# Altium PCB MONO65_PLATE_A1.PcbDoc
Units mm, origin at the board's own origin, x right, y up, seen from the top; angles counter-clockwise.
Board outline 321.35 x 111.8 mm, 2 copper layers (Component Side, Solder Side), stack 1.586 mm thick; 1 components, 0 nets, 0 pads, 0 vias.
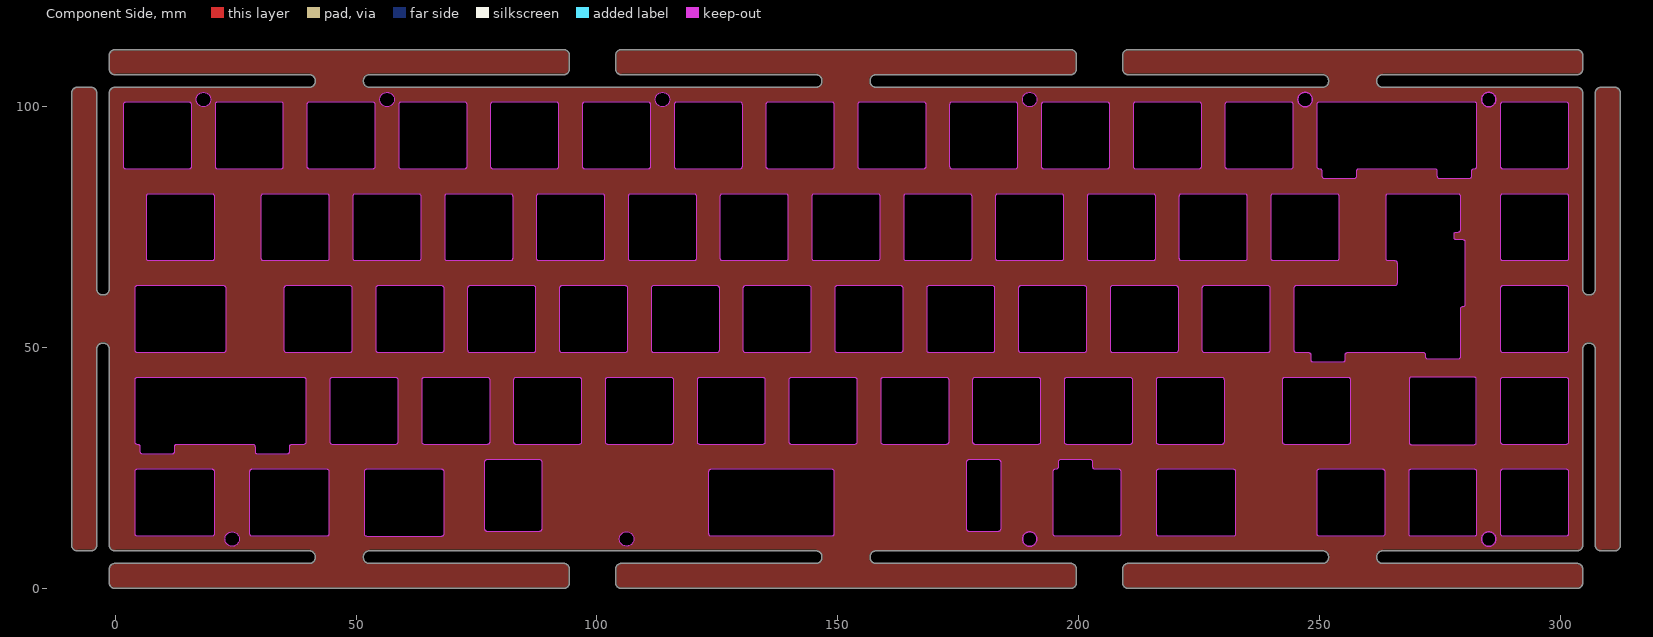
[diagram p0: Component Side view]
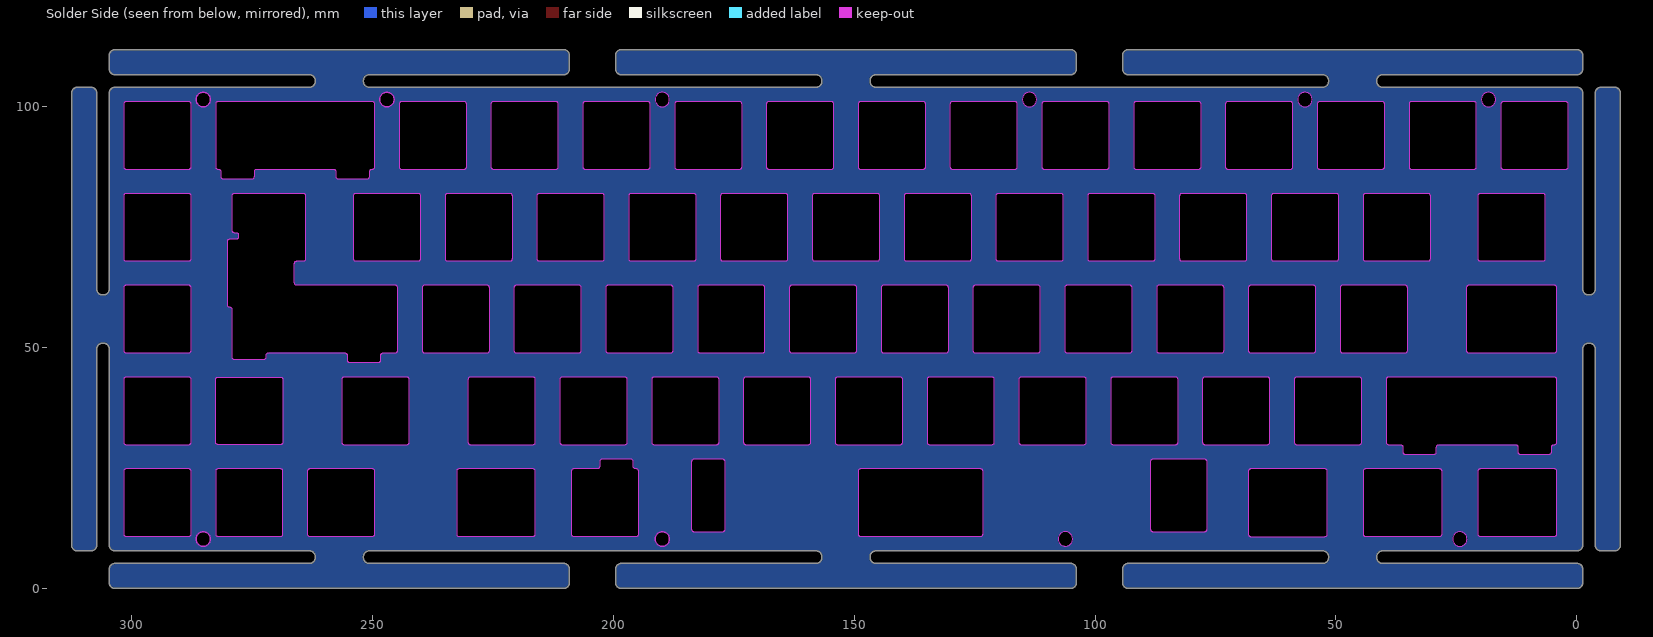
[diagram p1: Solder Side view, seen from below]

## Layer stack, top to bottom
Top Solder: solder mask 0.0102, Solder Resist, Dk 3.5
Component Side: signal copper 0.018
Dielectric 3: core 1.55, Core-009, Dk 4.5
Solder Side: signal copper 0.018
Bottom Solder: solder mask 0.0102, Solder Resist, Dk 3.5

## Board outline
303 vertices, not listed, extent -9,0 312.35,111.8
cut-out: 285.05,102.955 cw(c285.05,101.455) 286.55,101.455 cw(c285.05,101.455) 285.05,99.955 cw(c285.05,101.455) 283.55,101.455 cw(c285.05,101.455)
cut-out: 246.95,102.955 cw(c246.95,101.455) 248.45,101.455 cw(c246.95,101.455) 246.95,99.955 cw(c246.95,101.455) 245.45,101.455 cw(c246.95,101.455)
cut-out: 189.8,102.955 cw(c189.8,101.455) 191.3,101.455 cw(c189.8,101.455) 189.8,99.955 cw(c189.8,101.455) 188.3,101.455 cw(c189.8,101.455)
cut-out: 113.6,102.955 cw(c113.6,101.455) 115.1,101.455 cw(c113.6,101.455) 113.6,99.955 cw(c113.6,101.455) 112.1,101.455 cw(c113.6,101.455)
cut-out: 56.45,102.955 cw(c56.45,101.455) 57.95,101.455 cw(c56.45,101.455) 56.45,99.955 cw(c56.45,101.455) 54.95,101.455 cw(c56.45,101.455)
cut-out: 18.35,102.955 cw(c18.35,101.455) 19.85,101.455 cw(c18.35,101.455) 18.35,99.955 cw(c18.35,101.455) 16.85,101.455 cw(c18.35,101.455)
cut-out: 285.05,8.755 cw(c285.05,10.255) 283.55,10.255 cw(c285.05,10.255) 285.05,11.755 cw(c285.05,10.255) 286.55,10.255 cw(c285.05,10.255)
cut-out: 189.8,8.756 cw(c189.8,10.256) 188.3,10.256 cw(c189.8,10.256) 189.8,11.756 cw(c189.8,10.256) 191.3,10.256 cw(c189.8,10.256)
cut-out: 24.303,8.755 cw(c24.303,10.255) 22.803,10.255 cw(c24.303,10.255) 24.303,11.755 cw(c24.303,10.255) 25.803,10.255 cw(c24.303,10.255)
cut-out: 188.3,10.255 ccw(c189.8,10.255) 189.8,8.755 ccw(c189.8,10.255) 191.3,10.255 ccw(c189.8,10.255) 189.8,11.755 ccw(c189.8,10.255)
cut-out: 283.55,101.455 ccw(c285.05,101.455) 285.05,99.955 ccw(c285.05,101.455) 286.55,101.455 ccw(c285.05,101.455) 285.05,102.955 ccw(c285.05,101.455)
cut-out: 245.45,101.455 ccw(c246.95,101.455) 246.95,99.955 ccw(c246.95,101.455) 248.45,101.455 ccw(c246.95,101.455) 246.95,102.955 ccw(c246.95,101.455)
cut-out: 192.447,87.146 cw(c192.8,87.5) 192.3,87.5 192.3,100.5 cw(c192.798,100.5) 192.446,100.853 cw(c192.8,100.5) 192.8,101 205.8,101 cw(c205.8,100.502) 206.153,100.854 cw(c205.8,100.5) 206.3,100.5 206.3,87.5 cw(c205.802,87.5) 206.154,87.147 cw(c205.8,87.5) 205.8,87 192.8,87 cw(c192.8,87.498)
cut-out: 189.8,99.955 cw(c189.8,101.455) 188.3,101.455 cw(c189.8,101.455) 189.8,102.955 cw(c189.8,101.455) 191.3,101.455 cw(c189.8,101.455)
cut-out: 173.25,87.5 173.25,100.5 cw(c173.748,100.5) 173.396,100.853 cw(c173.75,100.5) 173.75,101 186.75,101 cw(c186.75,100.502) 187.103,100.854 cw(c186.75,100.5) 187.25,100.5 187.25,87.5 cw(c186.752,87.5) 187.104,87.147 cw(c186.75,87.5) 186.75,87 173.75,87 cw(c173.75,87.498) 173.397,87.146 cw(c173.75,87.5)
cut-out: 154.2,87.5 154.2,100.5 cw(c154.698,100.5) 154.346,100.853 cw(c154.7,100.5) 154.7,101 167.7,101 cw(c167.7,100.502) 168.053,100.854 cw(c167.7,100.5) 168.2,100.5 168.2,87.5 cw(c167.702,87.5) 168.054,87.147 cw(c167.7,87.5) 167.7,87 154.7,87 cw(c154.7,87.498) 154.347,87.146 cw(c154.7,87.5)
cut-out: 135.297,87.146 cw(c135.65,87.5) 135.15,87.5 135.15,100.5 cw(c135.648,100.5) 135.296,100.853 cw(c135.65,100.5) 135.65,101 148.65,101 cw(c148.65,100.502) 149.003,100.854 cw(c148.65,100.5) 149.15,100.5 149.15,87.5 cw(c148.652,87.5) 149.004,87.147 cw(c148.65,87.5) 148.65,87 135.65,87 cw(c135.65,87.498)
cut-out: 116.1,87.5 116.1,100.5 cw(c116.598,100.5) 116.246,100.853 cw(c116.6,100.5) 116.6,101 129.6,101 cw(c129.6,100.502) 129.953,100.854 cw(c129.6,100.5) 130.1,100.5 130.1,87.5 cw(c129.602,87.5) 129.954,87.147 cw(c129.6,87.5) 129.6,87 116.6,87 cw(c116.6,87.498) 116.247,87.146 cw(c116.6,87.5)
cut-out: 113.6,99.955 cw(c113.6,101.455) 112.1,101.455 cw(c113.6,101.455) 113.6,102.955 cw(c113.6,101.455) 115.1,101.455 cw(c113.6,101.455)
cut-out: 97.05,87.5 97.05,100.5 cw(c97.548,100.5) 97.196,100.853 cw(c97.55,100.5) 97.55,101 110.55,101 cw(c110.55,100.502) 110.903,100.854 cw(c110.55,100.5) 111.05,100.5 111.05,87.5 cw(c110.552,87.5) 110.904,87.147 cw(c110.55,87.5) 110.55,87 97.55,87 cw(c97.55,87.498) 97.197,87.146 cw(c97.55,87.5)
cut-out: 78.147,87.146 cw(c78.5,87.5) 78,87.5 78,100.5 cw(c78.498,100.5) 78.146,100.853 cw(c78.5,100.5) 78.5,101 91.5,101 cw(c91.5,100.502) 91.853,100.854 cw(c91.5,100.5) 92,100.5 92,87.5 cw(c91.502,87.5) 91.854,87.147 cw(c91.5,87.5) 91.5,87 78.5,87 cw(c78.5,87.498)
cut-out: 56.45,99.955 cw(c56.45,101.455) 54.95,101.455 cw(c56.45,101.455) 56.45,102.955 cw(c56.45,101.455) 57.95,101.455 cw(c56.45,101.455)
cut-out: 58.95,87.5 58.95,100.5 cw(c59.448,100.5) 59.096,100.853 cw(c59.45,100.5) 59.45,101 72.45,101 cw(c72.45,100.502) 72.803,100.854 cw(c72.45,100.5) 72.95,100.5 72.95,87.5 cw(c72.452,87.5) 72.804,87.147 cw(c72.45,87.5) 72.45,87 59.45,87 cw(c59.45,87.498) 59.097,87.146 cw(c59.45,87.5)
cut-out: 39.9,87.5 39.9,100.5 cw(c40.398,100.5) 40.046,100.853 cw(c40.4,100.5) 40.4,101 53.4,101 cw(c53.4,100.502) 53.753,100.854 cw(c53.4,100.5) 53.9,100.5 53.9,87.5 cw(c53.402,87.5) 53.754,87.147 cw(c53.4,87.5) 53.4,87 40.4,87 cw(c40.4,87.498) 40.047,87.146 cw(c40.4,87.5)
cut-out: 20.85,87.5 20.85,100.5 cw(c21.348,100.5) 20.996,100.853 cw(c21.35,100.5) 21.35,101 34.35,101 cw(c34.35,100.502) 34.703,100.854 cw(c34.35,100.5) 34.85,100.5 34.85,87.5 cw(c34.352,87.5) 34.704,87.147 cw(c34.35,87.5) 34.35,87 21.35,87 cw(c21.35,87.498) 20.997,87.146 cw(c21.35,87.5)
cut-out: 18.35,99.955 cw(c18.35,101.455) 16.85,101.455 cw(c18.35,101.455) 18.35,102.955 cw(c18.35,101.455) 19.85,101.455 cw(c18.35,101.455)
cut-out: 1.8,87.5 1.8,100.46 cw(c2.319,100.48) 1.938,100.833 cw(c2.32,100.48) 2.3,101 15.304,101 cw(c15.288,100.481) 15.668,100.835 cw(c15.287,100.479) 15.808,100.46 15.807,87.5 cw(c15.306,87.5) 15.659,87.145 cw(c15.305,87.5) 15.303,86.999 2.3,87 cw(c2.3,87.499) 1.947,87.146 cw(c2.301,87.5)
cut-out: 6.563,68.45 6.563,81.45 6.562,81.45 cw(c7.061,81.45) 6.709,81.803 cw(c7.063,81.45) 7.063,81.95 20.062,81.95 20.063,81.95 cw(c20.063,81.452) 20.416,81.804 cw(c20.062,81.45) 20.563,81.45 20.563,68.45 cw(c20.064,68.45) 20.416,68.097 cw(c20.062,68.45) 20.063,67.95 7.063,67.95 cw(c7.062,68.448) 6.709,68.096 cw(c7.063,68.45)
cut-out: 30.522,68.096 cw(c30.875,68.45) 30.375,68.45 30.375,81.45 cw(c30.873,81.45) 30.521,81.803 cw(c30.875,81.45) 30.875,81.95 43.875,81.95 cw(c43.875,81.452) 44.228,81.804 cw(c43.875,81.45) 44.375,81.45 44.375,68.45 cw(c43.877,68.45) 44.229,68.097 cw(c43.875,68.45) 43.875,67.95 30.875,67.95 cw(c30.875,68.448)
cut-out: 49.572,68.096 cw(c49.925,68.45) 49.425,68.45 49.425,81.45 cw(c49.923,81.45) 49.571,81.803 cw(c49.925,81.45) 49.925,81.95 62.925,81.95 cw(c62.925,81.452) 63.278,81.804 cw(c62.925,81.45) 63.425,81.45 63.425,68.45 cw(c62.927,68.45) 63.279,68.097 cw(c62.925,68.45) 62.925,67.95 49.925,67.95 cw(c49.925,68.448)
cut-out: 68.475,68.45 68.475,81.45 cw(c68.973,81.45) 68.621,81.803 cw(c68.975,81.45) 68.975,81.95 81.975,81.95 cw(c81.975,81.452) 82.328,81.804 cw(c81.975,81.45) 82.475,81.45 82.475,68.45 cw(c81.977,68.45) 82.329,68.097 cw(c81.975,68.45) 81.975,67.95 68.975,67.95 cw(c68.975,68.448) 68.622,68.096 cw(c68.975,68.45)
cut-out: 87.672,68.096 cw(c88.025,68.45) 87.525,68.45 87.525,81.45 cw(c88.023,81.45) 87.671,81.803 cw(c88.025,81.45) 88.025,81.95 101.025,81.95 cw(c101.025,81.452) 101.378,81.804 cw(c101.025,81.45) 101.525,81.45 101.525,68.45 cw(c101.027,68.45) 101.379,68.097 cw(c101.025,68.45) 101.025,67.95 88.025,67.95 cw(c88.025,68.448)
cut-out: 106.575,68.45 106.575,81.45 cw(c107.073,81.45) 106.721,81.803 cw(c107.075,81.45) 107.075,81.95 120.075,81.95 cw(c120.075,81.452) 120.428,81.804 cw(c120.075,81.45) 120.575,81.45 120.575,68.45 cw(c120.077,68.45) 120.429,68.097 cw(c120.075,68.45) 120.075,67.95 107.075,67.95 cw(c107.075,68.448) 106.722,68.096 cw(c107.075,68.45)
cut-out: 125.772,68.096 cw(c126.125,68.45) 125.625,68.45 125.625,81.45 cw(c126.123,81.45) 125.771,81.803 cw(c126.125,81.45) 126.125,81.95 139.125,81.95 cw(c139.125,81.452) 139.478,81.804 cw(c139.125,81.45) 139.625,81.45 139.625,68.45 cw(c139.127,68.45) 139.479,68.097 cw(c139.125,68.45) 139.125,67.95 126.125,67.95 cw(c126.125,68.448)
cut-out: 144.675,68.45 144.675,81.45 cw(c145.173,81.45) 144.821,81.803 cw(c145.175,81.45) 145.175,81.95 158.175,81.95 cw(c158.175,81.452) 158.528,81.804 cw(c158.175,81.45) 158.675,81.45 158.675,68.45 cw(c158.177,68.45) 158.529,68.097 cw(c158.175,68.45) 158.175,67.95 145.175,67.95 cw(c145.175,68.448) 144.822,68.096 cw(c145.175,68.45)
cut-out: 163.725,68.45 163.725,81.45 cw(c164.223,81.45) 163.871,81.803 cw(c164.225,81.45) 164.225,81.95 177.225,81.95 cw(c177.225,81.452) 177.578,81.804 cw(c177.225,81.45) 177.725,81.45 177.725,68.45 cw(c177.227,68.45) 177.579,68.097 cw(c177.225,68.45) 177.225,67.95 164.225,67.95 cw(c164.225,68.448) 163.872,68.096 cw(c164.225,68.45)
cut-out: 182.922,68.096 cw(c183.275,68.45) 182.775,68.45 182.775,81.45 cw(c183.273,81.45) 182.921,81.803 cw(c183.275,81.45) 183.275,81.95 196.275,81.95 cw(c196.275,81.452) 196.628,81.804 cw(c196.275,81.45) 196.775,81.45 196.775,68.45 cw(c196.277,68.45) 196.629,68.097 cw(c196.275,68.45) 196.275,67.95 183.275,67.95 cw(c183.275,68.448)
cut-out: 201.972,68.096 cw(c202.326,68.45) 201.825,68.45 201.825,81.45 cw(c202.325,81.45) 201.971,81.803 cw(c202.325,81.449) 202.325,81.95 215.325,81.95 cw(c215.325,81.45) 215.678,81.804 cw(c215.324,81.45) 215.825,81.45 215.825,68.45 cw(c215.325,68.45) 215.679,68.097 cw(c215.325,68.451) 215.325,67.95 202.325,67.95 cw(c202.325,68.45)
cut-out: 221.022,68.096 cw(c221.376,68.45) 220.875,68.45 220.875,81.45 cw(c221.375,81.45) 221.021,81.803 cw(c221.375,81.449) 221.375,81.95 234.375,81.95 cw(c234.375,81.45) 234.728,81.804 cw(c234.374,81.45) 234.875,81.45 234.875,68.45 cw(c234.375,68.45) 234.729,68.097 cw(c234.375,68.451) 234.375,67.95 221.375,67.95 cw(c221.375,68.45)
cut-out: 240.072,68.096 cw(c240.425,68.45) 239.925,68.45 239.925,81.45 cw(c240.423,81.45) 240.071,81.803 cw(c240.425,81.45) 240.425,81.95 253.425,81.95 cw(c253.425,81.452) 253.778,81.804 cw(c253.425,81.45) 253.925,81.45 253.925,68.45 cw(c253.427,68.45) 253.779,68.097 cw(c253.425,68.45) 253.425,67.95 240.425,67.95 cw(c240.425,68.448)
cut-out: 250.684,85.146 cw(c251.037,85.5) 250.537,85.5 250.537,86.5 ccw(c250.036,86.5) 250.39,86.854 ccw(c250.037,86.5) 250.037,87 249.95,87 cw(c249.95,87.498) 249.597,87.146 cw(c249.95,87.5) 249.45,87.5 249.45,100.5 cw(c249.948,100.5) 249.596,100.853 cw(c249.95,100.5) 249.95,101 282,101 cw(c282,100.502) 282.353,100.854 cw(c282,100.5) 282.5,100.5 282.5,87.5 cw(c282.002,87.5) 282.354,87.147 cw(c282,87.5) 282,87 281.913,87 ccw(c281.913,86.499) 281.559,86.853 ccw(c281.913,86.5) 281.413,86.5 281.413,85.5 cw(c280.915,85.5) 281.267,85.147 cw(c280.913,85.5) 280.913,85 274.913,85 cw(c274.913,85.498) 274.56,85.146 cw(c274.913,85.5) 274.413,85.5 274.413,86.5 ccw(c273.912,86.5) 274.266,86.854 ccw(c273.913,86.5) 273.913,87 258.037,87 ccw(c258.037,86.499) 257.683,86.853 ccw(c258.037,86.5) 257.537,86.5 257.537,85.5 cw(c257.039,85.5) 257.391,85.147 cw(c257.037,85.5) 257.037,85 251.037,85 cw(c251.037,85.498)
cut-out: 287.55,87.5 287.55,100.5 cw(c288.05,100.5) 287.696,100.853 cw(c288.05,100.499) 288.05,101 301.05,101 cw(c301.05,100.5) 301.403,100.854 cw(c301.049,100.5) 301.55,100.5 301.55,87.5 cw(c301.05,87.5) 301.404,87.147 cw(c301.05,87.501) 301.05,87 288.05,87 cw(c288.05,87.5) 287.697,87.146 cw(c288.051,87.5)
cut-out: 287.697,68.096 cw(c288.051,68.45) 287.55,68.45 287.55,81.45 cw(c288.05,81.45) 287.696,81.803 cw(c288.05,81.449) 288.05,81.95 301.05,81.95 cw(c301.05,81.45) 301.403,81.804 cw(c301.049,81.45) 301.55,81.45 301.55,68.45 cw(c301.05,68.45) 301.404,68.097 cw(c301.05,68.451) 301.05,67.95 288.05,67.95 cw(c288.05,68.45)
cut-out: 287.55,49.4 287.55,62.4 cw(c288.048,62.4) 287.696,62.753 cw(c288.05,62.4) 288.05,62.9 301.05,62.9 cw(c301.05,62.402) 301.403,62.754 cw(c301.05,62.4) 301.55,62.4 301.55,49.4 cw(c301.052,49.4) 301.404,49.047 cw(c301.05,49.4) 301.05,48.9 288.05,48.9 cw(c288.05,49.398) 287.697,49.046 cw(c288.05,49.4)
cut-out: 248.194,47.4 248.194,48.4 ccw(c247.693,48.4) 248.047,48.754 ccw(c247.694,48.401) 247.694,48.9 245.188,48.9 cw(c245.187,49.4) 244.834,49.046 cw(c245.189,49.4) 244.688,49.4 244.688,62.4 cw(c245.187,62.4) 244.834,62.753 cw(c245.188,62.399) 245.188,62.9 265.619,62.9 ccw(c265.618,63.4) 265.972,63.047 ccw(c265.62,63.4) 266.119,63.4 266.119,67.45 ccw(c265.618,67.45) 265.972,67.804 ccw(c265.619,67.451) 265.619,67.95 264.238,67.95 cw(c264.238,68.45) 263.885,68.096 cw(c264.239,68.45) 263.738,68.45 263.738,81.45 cw(c264.238,81.45) 263.884,81.803 cw(c264.238,81.449) 264.238,81.95 278.619,81.95 cw(c278.619,81.45) 278.972,81.804 cw(c278.617,81.449) 279.119,81.45 279.119,74.363 cw(c278.619,74.363) 278.973,74.01 cw(c278.619,74.364) 278.619,73.863 278.238,73.863 ccw(c278.238,73.363) 277.884,73.716 ccw(c278.236,73.363) 277.738,73.363 277.738,72.925 ccw(c278.238,72.925) 277.885,72.571 ccw(c278.238,72.923) 278.238,72.425 279.619,72.425 cw(c279.619,71.925) 279.972,72.279 cw(c279.617,71.924) 280.119,71.925 280.119,58.925 cw(c279.619,58.925) 279.973,58.572 cw(c279.619,58.926) 279.619,58.425 ccw(c279.619,57.925) 279.265,58.278 ccw(c279.617,57.925) 279.119,57.925 279.119,48.045 cw(c278.619,48.045) 278.973,47.692 cw(c278.619,48.046) 278.619,47.545 272.494,47.545 cw(c272.493,48.045) 272.14,47.691 cw(c272.495,48.045) 271.994,48.045 271.994,48.4 ccw(c271.493,48.4) 271.847,48.754 ccw(c271.494,48.401) 271.494,48.9 255.694,48.9 ccw(c255.694,48.4) 255.34,48.753 ccw(c255.692,48.4) 255.194,48.4 255.194,47.4 cw(c254.694,47.4) 255.048,47.047 cw(c254.694,47.401) 254.694,46.9 248.694,46.9 cw(c248.693,47.4) 248.34,47.046 cw(c248.695,47.4)
cut-out: 225.784,49.046 cw(c226.138,49.4) 225.637,49.4 225.638,49.4 225.638,62.4 225.637,62.4 cw(c226.136,62.4) 225.784,62.753 cw(c226.138,62.4) 226.138,62.9 239.137,62.9 239.138,62.9 cw(c239.138,62.402) 239.491,62.754 cw(c239.137,62.4) 239.638,62.4 239.638,49.4 cw(c239.139,49.4) 239.491,49.047 cw(c239.137,49.4) 239.138,48.9 226.138,48.9 cw(c226.137,49.398)
cut-out: 206.734,49.046 cw(c207.088,49.4) 206.587,49.4 206.588,49.4 206.588,62.4 206.587,62.4 cw(c207.086,62.4) 206.734,62.753 cw(c207.088,62.4) 207.088,62.9 220.087,62.9 220.088,62.9 cw(c220.088,62.402) 220.441,62.754 cw(c220.087,62.4) 220.588,62.4 220.588,49.4 cw(c220.089,49.4) 220.441,49.047 cw(c220.087,49.4) 220.088,48.9 207.088,48.9 cw(c207.087,49.398)
cut-out: 187.684,49.046 cw(c188.038,49.4) 187.537,49.4 187.538,49.4 187.538,62.4 187.537,62.4 cw(c188.036,62.4) 187.684,62.753 cw(c188.038,62.4) 188.038,62.9 201.037,62.9 201.038,62.9 cw(c201.038,62.402) 201.391,62.754 cw(c201.037,62.4) 201.538,62.4 201.538,49.4 cw(c201.039,49.4) 201.391,49.047 cw(c201.037,49.4) 201.038,48.9 188.038,48.9 cw(c188.037,49.398)
cut-out: 168.488,49.4 168.488,62.4 168.487,62.4 cw(c168.986,62.4) 168.634,62.753 cw(c168.988,62.4) 168.988,62.9 181.987,62.9 181.988,62.9 cw(c181.988,62.402) 182.341,62.754 cw(c181.987,62.4) 182.488,62.4 182.488,49.4 cw(c181.989,49.4) 182.341,49.047 cw(c181.987,49.4) 181.988,48.9 168.988,48.9 cw(c168.987,49.398) 168.634,49.046 cw(c168.988,49.4)
cut-out: 149.438,49.4 149.438,62.4 cw(c149.937,62.4) 149.584,62.753 cw(c149.938,62.399) 149.938,62.9 162.938,62.9 cw(c162.938,62.4) 163.291,62.754 cw(c162.936,62.4) 163.438,62.4 163.438,49.4 cw(c162.938,49.4) 163.291,49.047 cw(c162.937,49.401) 162.938,48.9 149.938,48.9 cw(c149.937,49.4) 149.584,49.046 cw(c149.939,49.4)
cut-out: 130.388,49.4 130.388,62.4 cw(c130.887,62.4) 130.534,62.753 cw(c130.888,62.399) 130.888,62.9 143.888,62.9 cw(c143.888,62.4) 144.241,62.754 cw(c143.886,62.4) 144.388,62.4 144.388,49.4 cw(c143.888,49.4) 144.241,49.047 cw(c143.887,49.401) 143.888,48.9 130.888,48.9 cw(c130.887,49.4) 130.534,49.046 cw(c130.889,49.4)
cut-out: 111.484,49.046 cw(c111.838,49.4) 111.337,49.4 111.338,49.4 111.338,62.4 111.337,62.4 cw(c111.836,62.4) 111.484,62.753 cw(c111.838,62.4) 111.838,62.9 124.837,62.9 124.838,62.9 cw(c124.838,62.402) 125.191,62.754 cw(c124.837,62.4) 125.338,62.4 125.338,49.4 cw(c124.839,49.4) 125.191,49.047 cw(c124.837,49.4) 124.838,48.9 111.838,48.9 cw(c111.837,49.398)
cut-out: 92.434,49.046 cw(c92.788,49.4) 92.287,49.4 92.288,49.4 92.288,62.4 92.287,62.4 cw(c92.786,62.4) 92.434,62.753 cw(c92.788,62.4) 92.788,62.9 105.787,62.9 105.788,62.9 cw(c105.788,62.402) 106.141,62.754 cw(c105.787,62.4) 106.288,62.4 106.288,49.4 cw(c105.789,49.4) 106.141,49.047 cw(c105.787,49.4) 105.788,48.9 92.788,48.9 cw(c92.787,49.398)
cut-out: 73.384,49.046 cw(c73.738,49.4) 73.237,49.4 73.238,49.4 73.238,62.4 73.237,62.4 cw(c73.736,62.4) 73.384,62.753 cw(c73.738,62.4) 73.738,62.9 86.737,62.9 86.738,62.9 cw(c86.738,62.402) 87.091,62.754 cw(c86.737,62.4) 87.238,62.4 87.238,49.4 cw(c86.739,49.4) 87.091,49.047 cw(c86.737,49.4) 86.738,48.9 73.738,48.9 cw(c73.737,49.398)
cut-out: 54.334,49.046 cw(c54.688,49.4) 54.187,49.4 54.188,49.4 54.188,62.4 54.187,62.4 cw(c54.686,62.4) 54.334,62.753 cw(c54.688,62.4) 54.688,62.9 67.687,62.9 67.688,62.9 cw(c67.688,62.402) 68.041,62.754 cw(c67.687,62.4) 68.188,62.4 68.188,49.4 cw(c67.689,49.4) 68.041,49.047 cw(c67.687,49.4) 67.688,48.9 54.688,48.9 cw(c54.687,49.398)
cut-out: 35.138,49.4 35.138,62.4 35.137,62.4 cw(c35.636,62.4) 35.284,62.753 cw(c35.638,62.4) 35.638,62.9 48.637,62.9 48.638,62.9 cw(c48.638,62.402) 48.991,62.754 cw(c48.637,62.4) 49.138,62.4 49.138,49.4 cw(c48.639,49.4) 48.991,49.047 cw(c48.637,49.4) 48.638,48.9 35.638,48.9 cw(c35.637,49.398) 35.284,49.046 cw(c35.638,49.4)
cut-out: 4.328,49.046 cw(c4.681,49.4) 4.181,49.4 4.181,62.4 cw(c4.68,62.4) 4.328,62.753 cw(c4.682,62.4) 4.681,62.9 22.444,62.9 cw(c22.444,62.401) 22.797,62.754 cw(c22.443,62.4) 22.944,62.4 22.944,49.4 cw(c22.445,49.4) 22.797,49.047 cw(c22.443,49.4) 22.444,48.9 4.681,48.9 cw(c4.681,49.399)
cut-out: 5.415,27.996 cw(c5.768,28.35) 5.268,28.35 5.268,29.35 ccw(c4.767,29.349) 5.122,29.704 ccw(c4.769,29.35) 4.768,29.85 4.681,29.85 cw(c4.681,30.349) 4.328,29.996 cw(c4.681,30.35) 4.181,30.35 4.181,43.35 cw(c4.68,43.35) 4.328,43.703 cw(c4.682,43.35) 4.681,43.85 39.112,43.85 39.113,43.85 cw(c39.113,43.352) 39.466,43.704 cw(c39.112,43.35) 39.613,43.35 39.613,30.35 cw(c39.114,30.35) 39.466,29.997 cw(c39.112,30.35) 39.113,29.85 36.644,29.85 ccw(c36.645,29.349) 36.29,29.703 ccw(c36.644,29.351) 36.144,29.35 36.144,28.35 cw(c35.645,28.35) 35.998,27.997 cw(c35.644,28.35) 35.644,27.85 29.644,27.85 cw(c29.644,28.349) 29.291,27.996 cw(c29.644,28.35) 29.144,28.35 29.144,29.35 ccw(c28.643,29.349) 28.998,29.704 ccw(c28.645,29.35) 28.644,29.85 12.768,29.85 ccw(c12.769,29.349) 12.414,29.703 ccw(c12.768,29.351) 12.268,29.35 12.268,28.35 cw(c11.769,28.35) 12.122,27.997 cw(c11.768,28.35) 11.768,27.85 5.768,27.85 cw(c5.768,28.349)
cut-out: 44.809,29.996 cw(c45.163,30.35) 44.662,30.35 44.663,30.35 44.663,43.35 44.662,43.35 cw(c45.161,43.35) 44.809,43.703 cw(c45.163,43.35) 45.163,43.85 58.162,43.85 58.163,43.85 cw(c58.163,43.352) 58.516,43.704 cw(c58.162,43.35) 58.663,43.35 58.663,30.35 cw(c58.164,30.35) 58.516,29.997 cw(c58.162,30.35) 58.163,29.85 45.163,29.85 cw(c45.162,30.348)
cut-out: 63.713,30.35 63.713,43.35 63.712,43.35 cw(c64.211,43.35) 63.859,43.703 cw(c64.213,43.35) 64.213,43.85 77.212,43.85 77.213,43.85 cw(c77.213,43.352) 77.566,43.704 cw(c77.212,43.35) 77.713,43.35 77.713,30.35 cw(c77.214,30.35) 77.566,29.997 cw(c77.212,30.35) 77.213,29.85 64.213,29.85 cw(c64.212,30.348) 63.859,29.996 cw(c64.213,30.35)
cut-out: 82.909,29.996 cw(c83.263,30.35) 82.762,30.35 82.763,30.35 82.763,43.35 82.762,43.35 cw(c83.261,43.35) 82.909,43.703 cw(c83.263,43.35) 83.263,43.85 96.262,43.85 96.263,43.85 cw(c96.263,43.352) 96.616,43.704 cw(c96.262,43.35) 96.763,43.35 96.763,30.35 cw(c96.264,30.35) 96.616,29.997 cw(c96.262,30.35) 96.263,29.85 83.263,29.85 cw(c83.262,30.348)
cut-out: 101.813,30.35 101.813,43.35 101.812,43.35 cw(c102.311,43.35) 101.959,43.703 cw(c102.313,43.35) 102.313,43.85 115.312,43.85 115.313,43.85 cw(c115.313,43.352) 115.666,43.704 cw(c115.312,43.35) 115.813,43.35 115.813,30.35 cw(c115.314,30.35) 115.666,29.997 cw(c115.312,30.35) 115.313,29.85 102.313,29.85 cw(c102.312,30.348) 101.959,29.996 cw(c102.313,30.35)
cut-out: 120.863,30.35 120.863,43.35 120.862,43.35 cw(c121.361,43.35) 121.009,43.703 cw(c121.363,43.35) 121.363,43.85 134.362,43.85 134.363,43.85 cw(c134.363,43.352) 134.716,43.704 cw(c134.362,43.35) 134.863,43.35 134.863,30.35 cw(c134.364,30.35) 134.716,29.997 cw(c134.362,30.35) 134.363,29.85 121.363,29.85 cw(c121.362,30.348) 121.009,29.996 cw(c121.363,30.35)
cut-out: 139.913,30.35 139.913,43.35 139.912,43.35 cw(c140.411,43.35) 140.059,43.703 cw(c140.413,43.35) 140.413,43.85 153.412,43.85 153.413,43.85 cw(c153.413,43.352) 153.766,43.704 cw(c153.412,43.35) 153.913,43.35 153.913,30.35 cw(c153.414,30.35) 153.766,29.997 cw(c153.412,30.35) 153.413,29.85 140.413,29.85 cw(c140.412,30.348) 140.059,29.996 cw(c140.413,30.35)
cut-out: 159.109,29.996 cw(c159.463,30.35) 158.962,30.35 158.963,30.35 158.963,43.35 158.962,43.35 cw(c159.461,43.35) 159.109,43.703 cw(c159.463,43.35) 159.463,43.85 172.462,43.85 172.463,43.85 cw(c172.463,43.352) 172.816,43.704 cw(c172.462,43.35) 172.963,43.35 172.963,30.35 cw(c172.464,30.35) 172.816,29.997 cw(c172.462,30.35) 172.463,29.85 159.463,29.85 cw(c159.462,30.348)
cut-out: 178.159,29.996 cw(c178.513,30.35) 178.012,30.35 178.013,30.35 178.013,43.35 178.012,43.35 cw(c178.511,43.35) 178.159,43.703 cw(c178.513,43.35) 178.513,43.85 191.512,43.85 191.513,43.85 cw(c191.513,43.352) 191.866,43.704 cw(c191.512,43.35) 192.013,43.35 192.013,30.35 cw(c191.514,30.35) 191.866,29.997 cw(c191.512,30.35) 191.513,29.85 178.513,29.85 cw(c178.512,30.348)
cut-out: 197.063,30.35 197.063,43.35 cw(c197.562,43.35) 197.209,43.703 cw(c197.563,43.349) 197.563,43.85 210.563,43.85 cw(c210.563,43.35) 210.916,43.704 cw(c210.561,43.35) 211.063,43.35 211.063,30.35 cw(c210.563,30.35) 210.916,29.997 cw(c210.562,30.351) 210.563,29.85 197.563,29.85 cw(c197.562,30.35) 197.209,29.996 cw(c197.564,30.35)
cut-out: 216.113,30.35 216.113,43.35 cw(c216.612,43.35) 216.613,43.85 229.613,43.85 cw(c229.612,43.35) 230.112,43.354 230.113,43.354 230.113,30.348 230.112,30.348 cw(c229.612,30.351) 229.613,29.85 216.613,29.85 cw(c216.612,30.35)
cut-out: 242.307,30.345 242.307,43.353 cw(c242.807,43.349) 242.805,43.85 255.808,43.85 cw(c255.806,43.349) 256.307,43.355 256.307,30.348 cw(c255.806,30.351) 255.808,29.85 242.805,29.85 cw(c242.807,30.351)
cut-out: 268.5,30.346 ccw(c269,30.351) 268.999,29.85 282,29.85 ccw(c282,30.35) 282.5,30.35 282.5,43.35 ccw(c282,43.35) 282,43.85 268.999,43.85 ccw(c269.001,43.349) 268.5,43.352
cut-out: 287.697,29.996 cw(c288.05,30.35) 287.55,30.35 287.55,43.35 cw(c288.048,43.35) 287.696,43.703 cw(c288.05,43.35) 288.05,43.85 301.05,43.85 cw(c301.05,43.352) 301.403,43.704 cw(c301.05,43.35) 301.55,43.35 301.55,30.35 cw(c301.052,30.35) 301.404,29.997 cw(c301.05,30.35) 301.05,29.85 288.05,29.85 cw(c288.05,30.348)
cut-out: 287.55,11.3 287.55,24.3 cw(c288.048,24.3) 287.696,24.653 cw(c288.05,24.3) 288.05,24.8 301.05,24.8 cw(c301.05,24.302) 301.403,24.654 cw(c301.05,24.3) 301.55,24.3 301.55,11.3 cw(c301.052,11.3) 301.404,10.947 cw(c301.05,11.3) 301.05,10.8 288.05,10.8 cw(c288.05,11.298) 287.697,10.946 cw(c288.05,11.3)
cut-out: 283.55,10.255 ccw(c285.05,10.255) 285.05,8.755 ccw(c285.05,10.255) 286.55,10.255 ccw(c285.05,10.255) 285.05,11.755 ccw(c285.05,10.255)
cut-out: 268.5,11.3 268.5,24.3 cw(c268.998,24.3) 268.646,24.653 cw(c269,24.3) 269,24.8 282,24.8 cw(c282,24.302) 282.353,24.654 cw(c282,24.3) 282.5,24.3 282.5,11.3 cw(c282.002,11.3) 282.354,10.947 cw(c282,11.3) 282,10.8 269,10.8 cw(c269,11.298) 268.647,10.946 cw(c269,11.3)
cut-out: 249.45,11.3 249.45,24.3 cw(c249.949,24.3) 249.596,24.653 cw(c249.95,24.3) 249.95,24.8 262.95,24.8 cw(c262.95,24.302) 263.303,24.654 cw(c262.95,24.3) 263.45,24.3 263.45,11.3 cw(c262.952,11.3) 263.304,10.947 cw(c262.95,11.3) 262.95,10.8 249.95,10.8 cw(c249.95,11.298) 249.597,10.946 cw(c249.95,11.3)
cut-out: 216.261,10.944 cw(c216.614,11.298) 216.114,11.298 216.114,24.306 cw(c216.613,24.306) 216.261,24.66 cw(c216.615,24.306) 216.615,24.806 231.996,24.797 cw(c231.996,24.297) 232.495,24.297 232.495,11.308 cw(c231.996,11.308) 231.996,10.808 216.615,10.798 cw(c216.614,11.297)
cut-out: 194.683,11.299 194.683,24.306 cw(c195.182,24.306) 194.829,24.659 cw(c195.183,24.306) 195.183,24.806 195.295,24.806 ccw(c195.295,25.308) 195.649,24.953 ccw(c195.296,25.306) 195.795,25.306 195.795,26.3 cw(c196.294,26.3) 195.942,26.653 cw(c196.296,26.3) 196.295,26.8 202.3,26.8 cw(c202.3,26.3) 202.795,26.368 202.795,25.304 ccw(c203.296,25.304) 203.295,24.804 208.183,24.802 cw(c208.183,24.302) 208.683,24.302 208.683,11.303 cw(c208.183,11.303) 208.183,10.803 195.183,10.799 cw(c195.183,11.298) 194.83,10.945 cw(c195.183,11.299)
cut-out: 176.745,12.267 176.745,26.348 cw(c177.257,26.29) 177.187,26.8 183.278,26.8 cw(c183.231,26.284) 183.745,26.346 183.745,12.268 cw(c183.223,12.313) 183.332,11.8 177.196,11.8 cw(c177.261,12.313)
cut-out: 123.244,11.3 123.244,24.3 cw(c123.742,24.3) 123.39,24.653 cw(c123.744,24.3) 123.744,24.8 148.65,24.8 cw(c148.65,24.301) 149.003,24.654 cw(c148.649,24.3) 149.15,24.3 149.15,11.3 cw(c148.651,11.3) 149.003,10.947 cw(c148.649,11.3) 148.65,10.8 123.744,10.8 cw(c123.743,11.299) 123.39,10.946 123.391,10.946 cw(c123.744,11.3)
cut-out: 106.151,8.77 cw(c106.151,10.27) 104.651,10.27 cw(c106.151,10.27) 106.151,11.77 cw(c106.151,10.27) 107.651,10.27 cw(c106.151,10.27)
cut-out: 76.893,11.944 cw(c77.244,12.3) 76.744,12.297 76.744,26.3 cw(c77.243,26.3) 76.89,26.654 cw(c77.244,26.299) 77.245,26.8 88.007,26.8 cw(c88.007,26.3) 88.507,26.3 88.507,12.297 cw(c88.007,12.3) 88.357,11.944 cw(c88.006,12.301) 88.002,11.8 77.247,11.8 cw(c77.243,12.299)
cut-out: 51.953,10.924 cw(c52.307,11.278) 51.806,11.278 51.806,24.302 cw(c52.305,24.302) 51.953,24.655 cw(c52.307,24.302) 52.306,24.802 67.687,24.803 cw(c67.687,24.304) 68.04,24.657 cw(c67.687,24.303) 68.187,24.303 68.187,11.268 cw(c67.688,11.268) 68.04,10.914 cw(c67.687,11.268) 67.686,10.768 52.306,10.778 cw(c52.306,11.276)
cut-out: 27.994,11.3 27.994,24.3 cw(c28.493,24.3) 28.14,24.653 cw(c28.494,24.3) 28.494,24.8 43.875,24.8 cw(c43.875,24.301) 44.228,24.654 cw(c43.875,24.3) 44.375,24.3 44.375,11.3 cw(c43.876,11.3) 44.228,10.947 cw(c43.874,11.3) 43.875,10.8 28.494,10.8 cw(c28.493,11.299) 28.141,10.946 28.14,10.946 cw(c28.494,11.3)
cut-out: 24.303,8.755 cw(c24.303,10.255) 22.803,10.255 cw(c24.303,10.255) 24.303,11.755 cw(c24.303,10.255) 25.803,10.255 cw(c24.303,10.255)
cut-out: 4.181,11.3 4.181,24.3 cw(c4.68,24.3) 4.328,24.653 cw(c4.682,24.3) 4.681,24.8 20.062,24.8 cw(c20.063,24.301) 20.416,24.654 20.415,24.654 cw(c20.062,24.3) 20.562,24.3 20.562,11.3 cw(c20.064,11.3) 20.416,10.947 cw(c20.062,11.3) 20.062,10.8 4.681,10.8 cw(c4.681,11.299) 4.328,10.946 cw(c4.682,11.3)
cut-out: 211.35,87.5 211.35,100.5 cw(c211.848,100.5) 211.496,100.853 cw(c211.85,100.5) 211.85,101 224.85,101 cw(c224.85,100.502) 225.203,100.854 cw(c224.85,100.5) 225.35,100.5 225.35,87.5 cw(c224.852,87.5) 225.204,87.147 cw(c224.85,87.5) 224.85,87 211.85,87 cw(c211.85,87.498) 211.497,87.146 cw(c211.85,87.5)
cut-out: 230.4,87.5 230.4,100.5 cw(c230.898,100.5) 230.546,100.853 cw(c230.9,100.5) 230.9,101 243.9,101 cw(c243.9,100.502) 244.253,100.854 cw(c243.9,100.5) 244.4,100.5 244.4,87.5 cw(c243.902,87.5) 244.254,87.147 cw(c243.9,87.5) 243.9,87 230.9,87 cw(c230.9,87.498) 230.547,87.146 cw(c230.9,87.5)
cut-out: 230.4,87.5 230.4,100.5 cw(c230.898,100.5) 230.546,100.853 cw(c230.9,100.5) 230.9,101 243.9,101 cw(c243.9,100.502) 244.253,100.854 cw(c243.9,100.5) 244.4,100.5 244.4,87.5 cw(c243.902,87.5) 244.254,87.147 cw(c243.9,87.5) 243.9,87 230.9,87 cw(c230.9,87.498) 230.547,87.146 cw(c230.9,87.5)
cut-out: 211.35,87.5 211.35,100.5 cw(c211.848,100.5) 211.496,100.853 cw(c211.85,100.5) 211.85,101 224.85,101 cw(c224.85,100.502) 225.203,100.854 cw(c224.85,100.5) 225.35,100.5 225.35,87.5 cw(c224.852,87.5) 225.204,87.147 cw(c224.85,87.5) 224.85,87 211.85,87 cw(c211.85,87.498) 211.497,87.146 cw(c211.85,87.5)

## Design rules (kind name [scope] priority, off if disabled: settings)
BoardOutlineClearance [All] p1: gap=0 ignorepadtopadclearanceinfootprint=FALSE except(0.2: Poly-OutlineEdge)
Clearance Clearance_FIDs [(InComponent('FID1') OR InComponent('FID2') OR InComponent('FID3') OR InComponent('FID4') OR InComponent('FID5') OR InComponent('FID6')) vs (InPolygon AND OnLayer('Component Side') OR OnLayer('Solder Side'))] p1: gap=0.5 ignorepadtopadclearanceinfootprint=FALSE
Clearance [All] p2: gap=0 ignorepadtopadclearanceinfootprint=TRUE
ComponentClearance [All] p1 off: gap=0.254 collisioncheckmode=3 verticalgap=0.254 showdistances=FALSE
DiffPairsRouting DiffPair_90_USB_DiffPairsRouting [InDifferentialPairClass('DIFF_90Ohm_USB')] p1: maxlimit=0.2 minlimit=0.2 mostfreqgap=0.2 toplayer_minwidth=0.135 toplayer_maxwidth=0.135 toplayer_prefwidth=0.135 bottomlayer_minwidth=0.135 bottomlayer_maxwidth=0.135 bottomlayer_prefwidth=0.135 maxuncoupledlength=12.7
DiffPairsRouting [All] p2: maxlimit=0.254 minlimit=0.254 mostfreqgap=0.254 toplayer_minwidth=0.381 toplayer_maxwidth=0.381 toplayer_prefwidth=0.381 bottomlayer_minwidth=0.381 bottomlayer_maxwidth=0.381 bottomlayer_prefwidth=0.381 maxuncoupledlength=12.7
Height [All] p1 off: minheight=0 maxheight=25.4 prefheight=12.7
HoleSize [All] p1: absolutevalues=TRUE maxlimit=5 minlimit=0.15 maxpercent=80.000 minpercent=20.000
MatchedLengths DiffPair_100_HDMI_MatchedLengths [InDifferentialPairClass('DIFF_100Ohm_HDMI')] p1: tolerance=0.15 checknetsindiffpair=TRUE checkdiffpairvsdiffpair=FALSE checkxsignals=FALSE checkothers=FALSE
MatchedLengths DiffPair_100_ETH_MatchedLengths [InDifferentialPairClass('DIFF_100Ohm_ETHERNET')] p2: tolerance=0.15 checknetsindiffpair=TRUE checkdiffpairvsdiffpair=FALSE checkxsignals=FALSE checkothers=FALSE
MatchedLengths DiffPair_100_DSI_MatchedLengths [InDifferentialPairClass('DIFF_100Ohm_DSI')] p3: tolerance=0.15 checknetsindiffpair=TRUE checkdiffpairvsdiffpair=FALSE checkxsignals=FALSE checkothers=FALSE
MatchedLengths DiffPair_90_USB_MatchedLengths [InDifferentialPairClass('DIFF_90Ohm_USB')] p4: tolerance=0.15 checknetsindiffpair=TRUE checkdiffpairvsdiffpair=FALSE checkxsignals=FALSE checkothers=FALSE
MinimumSolderMaskSliver [All] p1: minsoldermaskwidth=0.127
PlaneClearance [All] p1: clearance=0
PlaneConnect PlaneConnect_Via [IsVia] p1: planeconnectstyle=Direct reliefexpansion=0.508 reliefentries=4 reliefconductorwidth=0.254 reliefairgap=0.254
PlaneConnect [All] p2: pad.planeconnectstyle=Relief pad.reliefexpansion=0.5 pad.reliefentries=4 pad.reliefconductorwidth=0.75 pad.reliefairgap=0.15 via.planeconnectstyle=Direct via.reliefexpansion=0.5 via.reliefentries=4 via.reliefconductorwidth=0.75 via.reliefairgap=0.25
PolygonConnect [All] p1: connectstyle=Relief reliefconductorwidth=0.254 reliefentries=4 polygonreliefangle="90 Angle" airgapwidth=0.254
RoutingVias [All] p1: holewidth=0.3 width=0.55 viastyle="Through Hole" minholewidth=0.25 minwidth=0.5 maxholewidth=0.3 maxwidth=0.55
SolderMaskExpansion [All] p1: expansion=0.102
UnRoutedNet [All] p1: checkbadconnections=TRUE
Width [All] p1: maxlimit=20 minlimit=0.125 preferedwidth=0.5 minimp=50.000000 maximp=50.000000 favimp=50.000000
22 further rules are at their usual default settings.

## Components (designator, comment, footprint, x,y, rotation, side; value= is the part's Value field where it differs from the comment)
Designator3 "Comment" "TITLE BLOCK A2" -144.4,-147.7 r0 top locked

## Footprints (in the part's own frame and the unit in brackets; to place one, negate y for a bottom-side part, rotate by r counter-clockwise, add the part's x,y. Pads: shape width x height; smd on the part's side, far side on the other; paste and mask are expansions set on the pad)
"TITLE BLOCK A2" [mm] "Title block A2"

## Nets (pads, with @x,y where several pads share a name; then routed paths per layer and width w, separated by ;. In a path a pad name is that pad's centre, name@x,y a point inside that pad or via, vN(x,y) a via of type N, cw(c..) or ccw(c..) an arc to the next point about the centre after c; other vN are vias at no path point)

## Polygon pours and split planes (outlines as drawn)
no net on Component Side "TOP" (solid, pour order 4): 302 vertices, not listed, extent -9,0 312.35,111.8
no net on Solder Side "BOT" (solid, pour order 0): 302 vertices, not listed, extent -9,0 312.35,111.8

## Silkscreen, mask and mechanical layers (free items; w line width, h text height)
Top Solder:
  drawing of 1127 lines, arcs and shapes, not listed
Bottom Solder:
  drawing of 1119 lines, arcs and shapes, not listed
  text "MONO65_PLATE_A1" at 120.105,13 h1.5
Mechanical 1:
  drawing of 1144 lines, arcs and shapes, not listed
Mechanical 16:
  lines w0.2: 11.275,113.775 18.4,101.325 ; 17.15,-2.175 24.275,10.275 ; 17.325,101.525 18.4,101.325 ; 18.6,102.4 18.4,101.325 ; 23.2,10.075 24.275,10.275 ; 24.475,9.2 24.275,10.275 ; 49.425,113.925 56.55,101.475 ; 55.475,101.675 56.55,101.475 ; 56.75,102.55 56.55,101.475 ; 98.875,-2.475 106,9.975 ; 104.925,9.775 106,9.975 ; 106.2,8.9 106,9.975 ; 106.675,113.75 113.8,101.3 ; 112.725,101.5 113.8,101.3 ; 114,102.375 113.8,101.3 ; 182.675,-2.25 189.8,10.2 ; 182.9,113.65 190.025,101.2 ; 188.725,10 189.8,10.2 ; 188.95,101.4 190.025,101.2 ; 190,9.125 189.8,10.2 ; 190.225,102.275 190.025,101.2 ; 240.125,113.625 247.25,101.175 ; 246.175,101.375 247.25,101.175 ; 247.45,102.25 247.25,101.175 ; 277.875,-2.075 285,10.375 ; 278.05,113.625 285.175,101.175 ; 283.925,10.175 285,10.375 ; 284.1,101.375 285.175,101.175 ; 285.2,9.3 285,10.375 ; 285.375,102.25 285.175,101.175
  text "PLATED / HOLE" at 44.875,114.15 h1.5
  text "PLATED / HOLE" at 6.725,114 h1.5
  text "PLATED / HOLE" at 102.125,113.975 h1.5
  text "PLATED / HOLE" at 178.35,113.875 h1.5
  text "PLATED / HOLE" at 235.575,113.85 h1.5
  text "PLATED / HOLE" at 273.5,113.85 h1.5
  text "PLATED / HOLE" at 4.35,90.525 h1.5
  text "PLATED / HOLE" at 23.4,90.525 h1.5
  text "PLATED / HOLE" at 42.475,90.525 h1.5
  text "PLATED / HOLE" at 61.525,90.525 h1.5
  text "PLATED / HOLE" at 80.575,90.525 h1.5
  text "PLATED / HOLE" at 99.625,90.525 h1.5
  text "PLATED / HOLE" at 118.675,90.525 h1.5
  text "PLATED / HOLE" at 137.725,90.525 h1.5
  text "PLATED / HOLE" at 156.925,90.525 h1.5
  text "PLATED / HOLE" at 175.8,90.525 h1.5
  text "PLATED / HOLE" at 194.925,90.525 h1.5
  text "PLATED / HOLE" at 214.05,90.525 h1.5
  text "PLATED / HOLE" at 233.1,90.525 h1.5
  text "PLATED / HOLE" at 261.3,90.5 h1.5
  text "PLATED / HOLE" at 290.325,90.4 h1.5
  text "PLATED / HOLE" at 51.8,71.875 h1.5
  text "PLATED / HOLE" at 70.9,71.85 h1.5
  text "PLATED / HOLE" at 109.25,71.825 h1.5
  text "PLATED / HOLE" at 147.175,71.825 h1.5
  text "PLATED / HOLE" at 128.275,71.8 h1.5
  text "PLATED / HOLE" at 242.6,71.75 h1.5
  text "PLATED / HOLE" at 204.6,71.725 h1.5
  text "PLATED / HOLE" at 33.2,71.6 h1.5
  text "PLATED / HOLE" at 9.2,71.55 h1.5
  text "PLATED / HOLE" at 166.225,71.55 h1.5
  text "PLATED / HOLE" at 223.85,71.55 h1.5
  text "PLATED / HOLE" at 185.075,71.5 h1.5
  text "PLATED / HOLE" at 90.125,71.45 h1.5
  text "PLATED / HOLE" at 290.525,71.325 h1.5
  text "PLATED / HOLE" at 94.875,53.025 h1.5
  text "PLATED / HOLE" at 132.875,52.95 h1.5
  text "PLATED / HOLE" at 57.2,52.825 h1.5
  text "PLATED / HOLE" at 190.35,52.8 h1.5
  text "PLATED / HOLE" at 37.9,52.725 h1.5
  text "PLATED / HOLE" at 113.85,52.675 h1.5
  text "PLATED / HOLE" at 171.2,52.625 h1.5
  text "PLATED / HOLE" at 75.675,52.575 h1.5
  text "PLATED / HOLE" at 289.875,52.55 h1.5
  text "PLATED / HOLE" at 8.725,52.525 h1.5
  text "PLATED / HOLE" at 254,52.5 h1.5
  text "PLATED / HOLE" at 151.95,52.45 h1.5
  text "PLATED / HOLE" at 228.1,52.45 h1.5
  text "PLATED / HOLE" at 209.3,52.375 h1.5
  text "PLATED / HOLE" at 104.7,33.95 h1.5
  text "PLATED / HOLE" at 66.15,33.875 h1.5
  text "PLATED / HOLE" at 47.675,33.8 h1.5
  text "PLATED / HOLE" at 244.9,33.75 h1.5
  text "PLATED / HOLE" at 180.6,33.675 h1.5
  text "PLATED / HOLE" at 123.55,33.65 h1.5
  text "PLATED / HOLE" at 142.95,33.6 h1.5
  text "PLATED / HOLE" at 218.4,33.6 h1.5
  text "PLATED / HOLE" at 200.025,33.575 h1.5
  text "PLATED / HOLE" at 161.5,33.55 h1.5
  text "PLATED / HOLE" at 85.6,33.475 h1.5
  text "PLATED / HOLE" at 271.25,33.45 h1.5
  text "PLATED / HOLE" at 290.175,33.35 h1.5
  text "PLATED / HOLE" at 16.65,33.175 h1.5
  text "PLATED / HOLE" at 78.05,15.825 h1.5
  text "PLATED / HOLE" at 132.025,15.05 h1.5
  text "PLATED / HOLE" at 270.725,14.825 h1.5
  text "PLATED / HOLE" at 219.9,14.8 h1.5
  text "PLATED / HOLE" at 55.85,14.7 h1.5
  text "PLATED / HOLE" at 197.3,14.675 h1.5
  text "PLATED / HOLE" at 8.025,14.425 h1.5
  text "PLATED / HOLE" at 183.278,14.425 h1.5 r90
  text "PLATED / HOLE" at 290.6,14.4 h1.5
  text "PLATED / HOLE" at 31.875,14.325 h1.5
  text "PLATED / HOLE" at 251.925,14.125 h1.5
  text "PLATED / HOLE" at 272.175,-8.625 h1.5
  text "PLATED / HOLE" at 11.45,-8.725 h1.5
  text "PLATED / HOLE" at 176.975,-8.8 h1.5
  text "PLATED / HOLE" at 93.175,-9.025 h1.5
Mechanical 80:
  text "CLOSED SOURCE" at 352.7,-129.7 h2
  text "A1" at 404,-129.7 h2
Mechanical 81:
  text "CLOSED SOURCE" at -75.8,-129.8 h2
  text "A1" at -126.099,-129.958 h2
Mechanical 100:
  drawing of 1145 lines, arcs and shapes, not listed

## Text inside footprints (layer, text, board x,y; h text height)
Designator3: Mechanical 80 "1:1 [A2]" at 396.84,-138.58 h2; Mechanical 80 "PCB DESIGNER:" at 301.43,-112.06 h1.14; Mechanical 80 "DATE:" at 301.43,-127.3 h1.14; Mechanical 80 "SCALE:" at 392.87,-134.92 h1.14; Mechanical 80 "REV:" at 392.87,-127.3 h1.14; Mechanical 80 "TITLE:" at 339.53,-112.06 h1.14; Mechanical 80 "FILE NAME:" at 301.43,-134.92 h1.14; Mechanical 80 "VIEW SIDE:" at 301.43,-119.553 h1.14; Mechanical 80 "Aljaz Titoric" at 271.34,-124.78 h2; Mechanical 80 "www.aljaztitoric.com" at 270.84,-128.3 h1.5; Mechanical 80 "TOP SIDE" at 302.7,-123.08 h1.75; Mechanical 80 "6" at 244.398,246.381 h1.78; Mechanical 80 "6" at 244.398,-144.525 h1.78; Mechanical 80 "A" at 417.575,199.188 h1.78; Mechanical 80 "D" at 417.575,-100.024 h1.78; Mechanical 80 "A" at -141.225,199.188 h1.78; Mechanical 80 "D" at -141.225,-100.024 h1.78; Mechanical 80 "B" at 417.575,99.366 h1.78; Mechanical 80 "C" at 417.575,-0.202 h1.78; Mechanical 80 "7" at 315.518,246.381 h1.78; Mechanical 80 "7" at 315.518,-144.525 h1.78; Mechanical 80 "5" at 173.515,246.381 h1.78; Mechanical 80 "5" at 173.515,-144.525 h1.78; Mechanical 80 "4" at 102.818,246.381 h1.78; Mechanical 80 "4" at 102.818,-144.525 h1.78; Mechanical 80 "3" at 31.783,246.381 h1.78; Mechanical 80 "3" at 31.783,-144.525 h1.78; Mechanical 80 "2" at -38.812,246.381 h1.78; Mechanical 80 "2" at -38.812,-144.525 h1.78; Mechanical 80 "B" at -141.225,99.366 h1.78; Mechanical 80 "C" at -141.225,-0.202 h1.78; Mechanical 80 "8" at 386.13,246.381 h1.78; Mechanical 80 "8" at 386.13,-144.525 h1.78; Mechanical 80 "1" at -109.441,246.381 h1.78; Mechanical 80 "1" at -109.441,-144.525 h1.78; Mechanical 81 "8" at -108.51,-144.525 h1.78; Mechanical 81 "8" at -108.51,246.381 h1.78; Mechanical 81 "2" at 316.432,-144.525 h1.78; Mechanical 81 "2" at 316.432,246.381 h1.78; Mechanical 81 "1" at 387.061,-144.525 h1.78; Mechanical 81 "1" at 387.061,246.381 h1.78; Mechanical 81 "D" at -139.955,-100.024 h1.78; Mechanical 81 "C" at -139.955,-0.202 h1.78; Mechanical 81 "B" at -139.955,99.366 h1.78; Mechanical 81 "7" at -37.898,-144.525 h1.78; Mechanical 81 "7" at -37.898,246.381 h1.78; Mechanical 81 "6" at 33.222,-144.525 h1.78; Mechanical 81 "6" at 33.222,246.381 h1.78; Mechanical 81 "4" at 174.802,-144.525 h1.78; Mechanical 81 "4" at 174.802,246.381 h1.78; Mechanical 81 "3" at 245.837,-144.525 h1.78; Mechanical 81 "3" at 245.837,246.381 h1.78; Mechanical 81 "D" at 418.845,-100.024 h1.78; Mechanical 81 "C" at 418.845,-0.202 h1.78; Mechanical 81 "B" at 418.845,99.366 h1.78; Mechanical 81 "A" at -139.955,199.188 h1.78; Mechanical 81 "A" at 418.845,199.188 h1.78; Mechanical 81 "5" at 104.105,-144.525 h1.78; Mechanical 81 "5" at 104.105,246.381 h1.78; Mechanical 81 "BOTTOM SIDE" at -24.98,-123.16 h1.75; Mechanical 81 "www.aljaztitoric.com" at 6.88,-128.38 h1.5; Mechanical 81 "Aljaz Titoric" at 6.58,-124.66 h2; Mechanical 81 "VIEW SIDE:" at -23.71,-119.633 h1.14; Mechanical 81 "FILE NAME:" at -23.71,-135 h1.14; Mechanical 81 "TITLE:" at -61.81,-112.14 h1.14; Mechanical 81 "REV:" at -115.15,-127.38 h1.14; Mechanical 81 "SCALE:" at -115.15,-135 h1.14; Mechanical 81 "DATE:" at -23.71,-127.38 h1.14; Mechanical 81 "PCB DESIGNER:" at -23.71,-112.14 h1.14; Mechanical 81 "1:1 [A2]" at -119.12,-138.66 h2